# Altium PCB OmniCore_SDR.PcbDoc (part 5 of 13)
Units mil, origin at the board's own origin, x right, y up, seen from the top; angles counter-clockwise.
Board outline 4724.72 x 2755.91 mil, 8 copper layers (Top, GND 1, Layer 1, Layer 2, GND 2, Layer 3, Power, Bottom), stack 40.468 mil thick; 530 components, 427 nets, 2315 pads, 1715 vias.
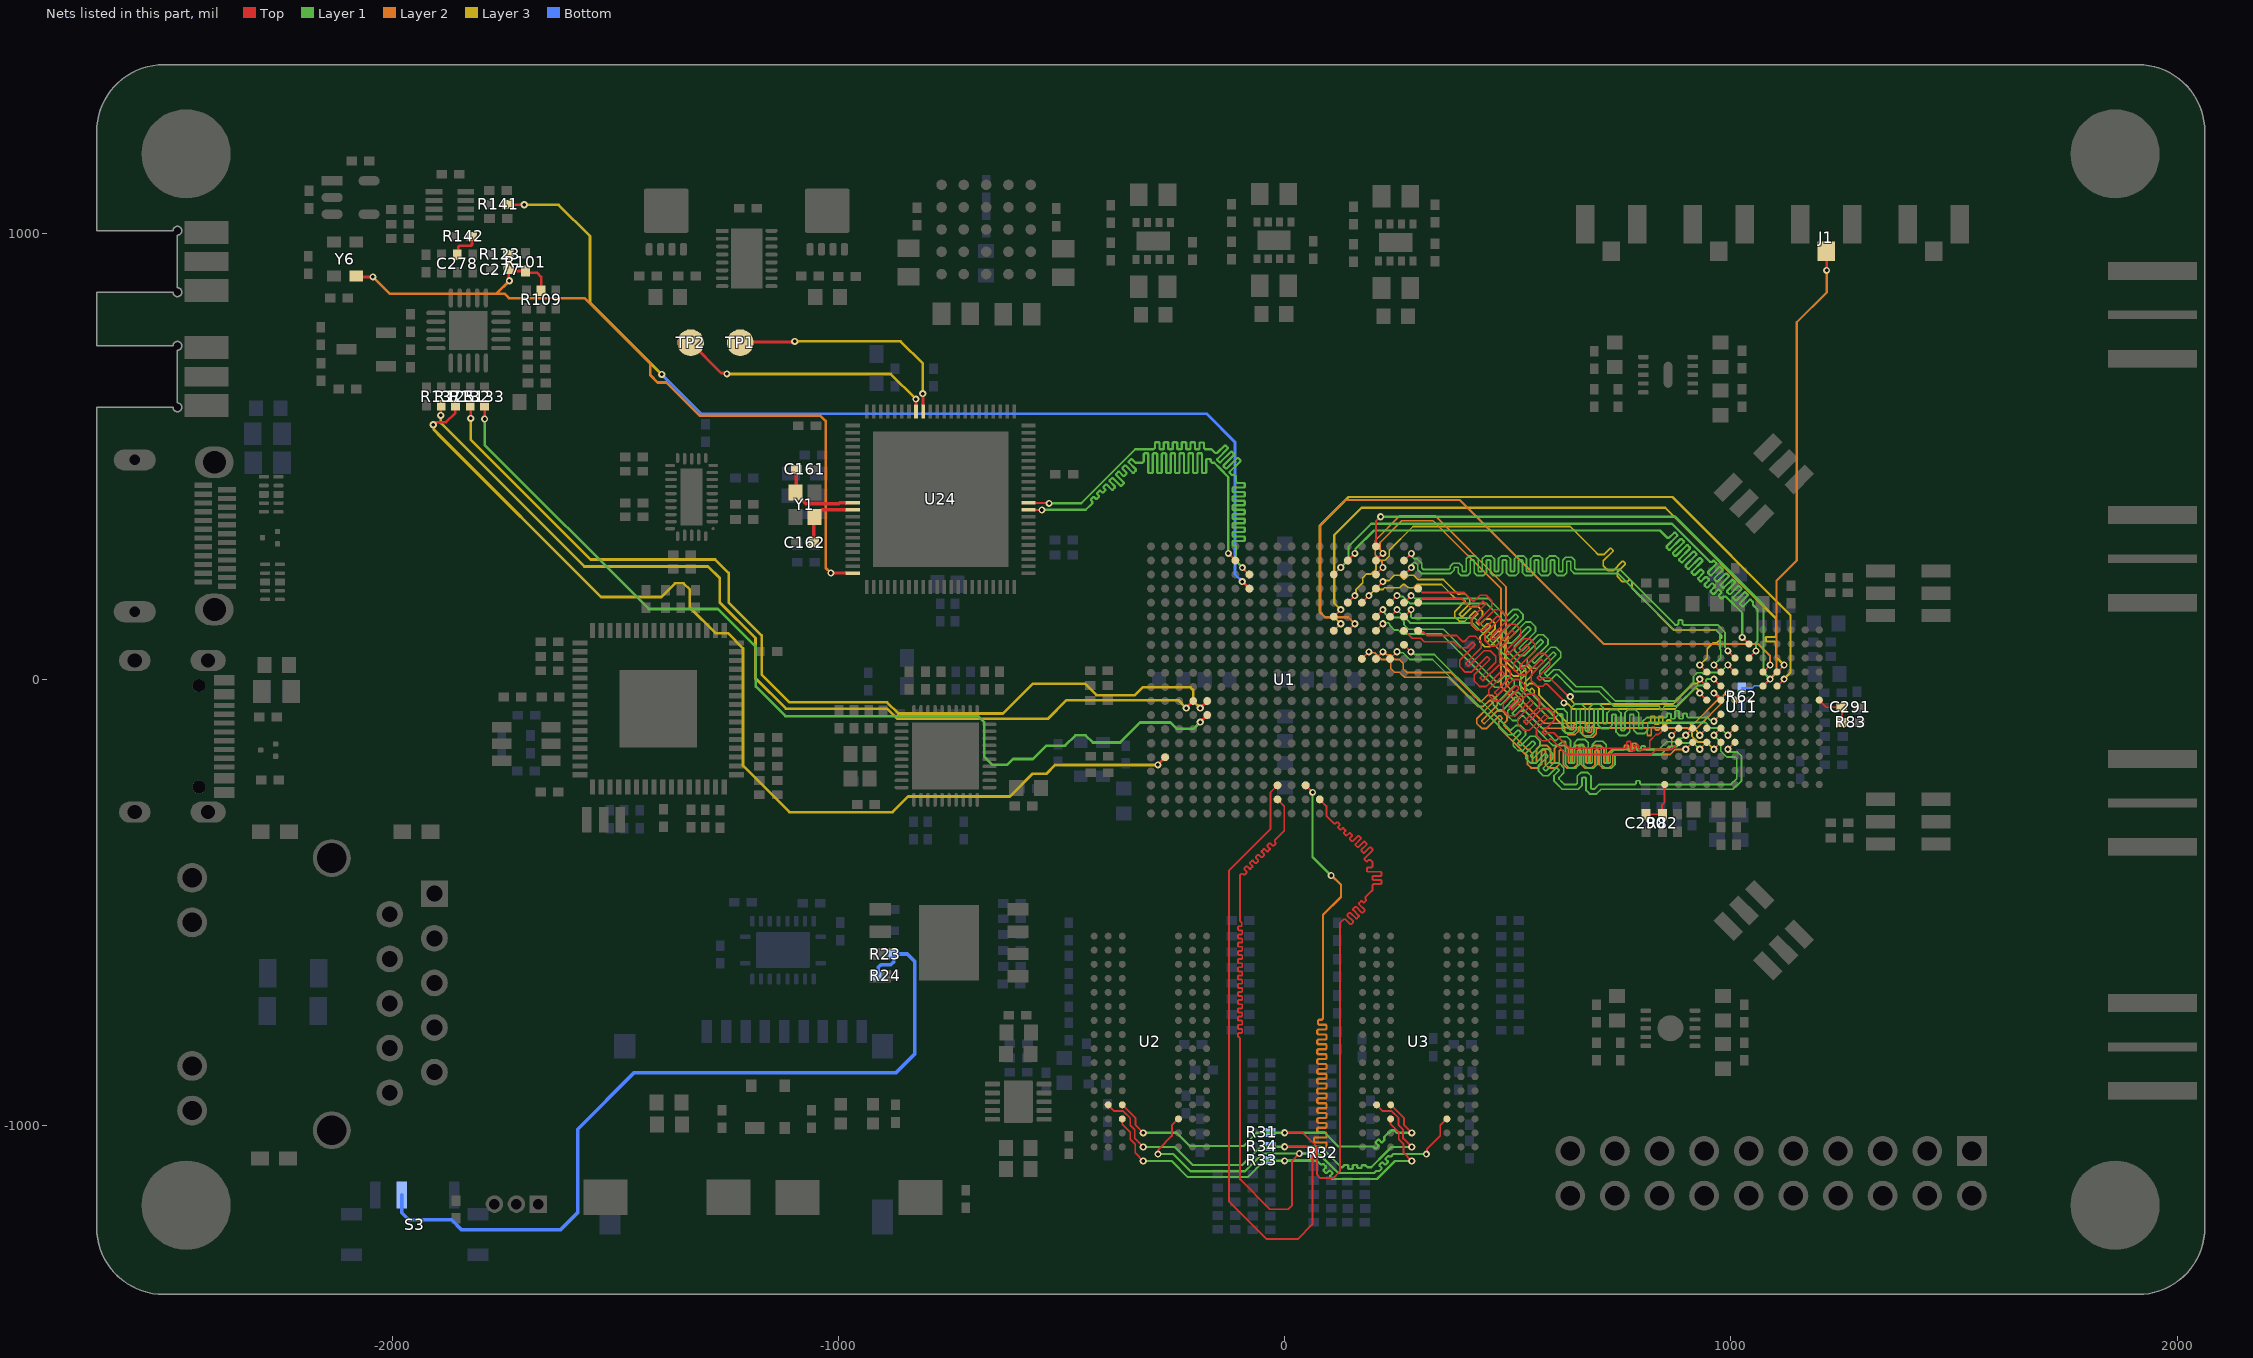
[diagram p10: the nets of this part, all layers, seen from the top]

## Via types
v1: diameter 16, hole 8, Top to Bottom, tented both sides, 1667 vias
v2: diameter 19.68, hole 7.87, Top to Bottom, 44 vias
v3: diameter 200, hole 125, Top to Bottom, 4 vias

## Nets (pads, with @x,y where several pads share a name; then routed paths per layer and width w, separated by ;. In a path a pad name is that pad's centre, name@x,y a point inside that pad or via, vN(x,y) a via of type N, cw(c..) or ccw(c..) an arc to the next point about the centre after c; other vN are vias at no path point) (continued)
AD9361_RX_D3_P: U1.R16 U11.J9 | length 1283.4
  Top w4: U1.R16@141.49,172.44 v1(157.28,188.23) ; v1(930.25,32.7) U11.J9@946,16.95
  Layer 3 w4: v1(157.28,188.23) 159.53,190.48 159.53,201.73 174.73,216.93 174.73,228.18 183.34,236.78 194.13,236.78 204.78,247.43 204.78,258.22 214.11,267.55 224.9,267.55 234.23,276.88 234.23,289.73 287.5,343 640,343 696,287 699.69,283.31 702.91,280.09 715.34,280.09 729.39,294.13 731.3,294.13 735.75,289.68 735.75,287.77 714.01,266.03 714.01,255.01 724.91,244.11 735.93,244.11 756.79,264.97 758.7,264.97 763.16,260.51 763.16,258.6 746.05,241.5 746.05,230.48 756.95,219.58 767.97,219.58 771.91,223.52 773.82,223.52 778.27,219.06 778.27,217.15 778.27,204.73 796,187 799.69,183.31 872.22,110.78 967.67,110.78 979,99.44 979,93.15 967.55,81.69 959.45,81.69 946.81,69.06 946.81,49.26 v1(930.25,32.7)
AD9361_RX_D4_N: U1.W19 U11.K7 | length 1328.2
  Top w4: U1.W19@267.47,266.93 267.95,266.93 283.52,282.5 v1(284,282.5) ; v1(993.24,64.2) U11.K7@1008.99,48.45
  Layer 1 w4: v1(284,282.5) 286.3,280.2 286.3,274.19 289.24,271.25 296.28,271.25 307,260.53 307,250.2 310.2,247 364,247 368.64,247 370.98,249.34 370.98,253.91 377.6,260.53 391.36,260.53 397.98,253.91 397.98,243.35 399.33,242 405.63,242 406.98,243.35 406.98,270.38 413.6,277 427.36,277 433.98,270.38 433.98,243.35 435.33,242 441.63,242 442.98,243.35 442.98,270.38 449.6,277 463.36,277 469.98,270.38 469.98,243.35 471.33,242 477.63,242 478.98,243.35 478.98,270.38 485.6,277 499.36,277 505.98,270.38 505.98,243.35 507.33,242 513.63,242 514.98,243.35 514.98,270.38 521.6,277 535.36,277 541.98,270.38 541.98,243.35 543.33,242 549.63,242 550.98,243.35 550.98,270.38 557.6,277 571.36,277 577.98,270.38 577.98,243.35 579.33,242 585.63,242 586.98,243.35 586.98,270.38 593.6,277 607.36,277 613.98,270.38 613.98,243.35 615.33,242 621.63,242 622.98,243.35 622.98,267.45 629.6,274.07 643.36,274.07 649.98,267.45 649.98,249.34 652.32,247 687,247 750.44,247 874.99,122.46 878.02,122.46 880.02,122.46 882.36,124.8 882.36,132.11 883.71,133.46 890.01,133.46 891.36,132.11 891.36,124.8 893.71,122.46 954,122.46 970.34,122.46 986.75,106.05 986.75,72.54 993.24,66.04 v1(993.24,64.2)
AD9361_RX_D4_P: U1.W18 U11.J8 | length 1329
  Top w4: U1.W18@267.47,235.43 267.95,235.43 283.52,251 v1(284,251) ; v1(961.75,32.7) U11.J8@977.5,16.95
  Layer 1 w4: v1(284,251) 286.3,253.3 286.3,259.31 289.24,262.25 292.55,262.25 298,256.8 298,246.47 306.47,238 364,238 372.36,238 379.98,245.62 379.98,250.18 381.33,251.53 387.63,251.53 388.98,250.18 388.98,239.62 395.6,233 409.36,233 415.98,239.62 415.98,266.65 417.33,268 423.63,268 424.98,266.65 424.98,239.62 431.6,233 445.36,233 451.98,239.62 451.98,266.65 453.33,268 459.63,268 460.98,266.65 460.98,239.62 467.6,233 481.36,233 487.98,239.62 487.98,266.65 489.33,268 495.63,268 496.98,266.65 496.98,239.62 503.6,233 517.36,233 523.98,239.62 523.98,266.65 525.33,268 531.63,268 532.98,266.65 532.98,239.62 539.6,233 553.36,233 559.98,239.62 559.98,266.65 561.33,268 567.63,268 568.98,266.65 568.98,239.62 575.6,233 589.36,233 595.98,239.62 595.98,266.65 597.33,268 603.63,268 604.98,266.65 604.98,239.62 611.6,233 625.36,233 631.98,239.62 631.98,263.72 633.33,265.07 639.63,265.07 640.98,263.72 640.98,245.62 648.59,238 687,238 746.72,238 871.26,113.46 871.47,113.46 873.47,111.46 878.02,111.46 965.78,111.46 975.75,101.49 975.75,67.98 977.31,66.42 977.31,48.27 v1(961.75,32.7)
AD9361_RX_D5_N: U1.W16 U11.J7 | length 1326.5
  Top w4: U1.W16@267.47,172.44 v1(283.22,188.19) ; v1(993.24,32.7) U11.J7@1008.99,16.95
  Layer 1 w4: v1(283.22,188.19) 285.07,188.19 291.56,181.69 456.06,181.69 490.88,146.88 494.57,143.19 497.89,143.19 511.93,157.23 522.95,157.23 533.85,146.33 533.85,135.31 497.89,99.35 497.89,97.44 502.34,92.99 504.25,92.99 540.21,128.95 551.24,128.95 562.13,118.05 562.13,107.03 526.17,71.07 526.17,69.16 530.63,64.7 532.54,64.7 568.5,100.66 579.52,100.66 590.42,89.77 590.42,78.74 554.46,42.78 554.46,40.87 558.91,36.42 560.82,36.42 596.78,72.38 607.8,72.38 618.7,61.48 618.7,50.46 582.74,14.5 582.74,12.59 587.2,8.13 589.11,8.13 603.15,22.18 615.58,22.18 632.1,5.65 635.8,1.96 653.76,-16 709,-16 741,-48 874.44,-48 916.25,-6.19 916.25,7 924.45,15.2 936.05,15.2 938.85,12.41 951.41,12.41 955.14,16.14 976.69,16.14 v1(993.24,32.7)
AD9361_RX_D5_P: U1.V16 U11.H8 | length 1326.2
  Top w4: U1.V16@235.98,172.44 v1(251.72,188.19) ; v1(961.75,1.2) U11.H8@977.5,-14.54
  Layer 1 w4: v1(251.72,188.19) 254.02,185.89 265.27,185.89 280.47,170.69 451.51,170.69 483.1,139.1 486.79,135.41 490.02,132.19 502.44,132.19 516.49,146.23 518.4,146.23 522.85,141.78 522.85,139.87 486.89,103.91 486.89,92.89 497.79,81.99 508.81,81.99 544.77,117.95 546.68,117.95 551.13,113.49 551.13,111.58 515.17,75.62 515.17,64.6 526.07,53.7 537.09,53.7 573.05,89.66 574.96,89.66 579.42,85.21 579.42,83.3 543.46,47.34 543.46,36.32 554.36,25.42 565.38,25.42 601.34,61.38 603.25,61.38 607.7,56.93 607.7,55.02 571.74,19.05 571.74,8.03 582.64,-2.87 593.66,-2.87 607.71,11.18 611.02,11.18 624.33,-2.12 628.02,-5.82 649.2,-27 704.44,-27 736.44,-59 827,-59 838,-59 840.34,-61.34 840.34,-65.72 841.69,-67.07 847.99,-67.07 849.34,-65.72 849.34,-61.34 851.69,-59 866,-59 879,-59 924.55,-13.45 935.4,-13.45 944.25,-4.59 944.25,-1.06 946.72,1.41 960.15,1.41 v1@961.05,0.51
AD9361_RX_FRAME_N: U1.U19 U11.G7 | length 1320.6
  Top w4: U1.U19@204.48,266.93 v1(220.23,282.68) ; v1(993.24,-30.29) U11.G7@1008.99,-46.04
  Layer 2 w4: v1(220.23,282.68) 220.23,284.52 213.73,291.02 213.73,307.18 262.56,356 332.44,356 485,203.44 485,-16.43 577.56,-109 585.17,-109 625.09,-109 627.43,-111.34 627.43,-115.37 635.23,-123.16 650.64,-123.16 658.43,-115.37 658.43,-107.35 659.78,-106 666.08,-106 667.43,-107.35 667.43,-121.21 675.23,-129 690.64,-129 698.43,-121.21 698.43,-111.34 700.78,-109 706,-109 799,-109 810,-109 812.34,-111.34 812.34,-124.19 813.69,-125.54 819.99,-125.54 821.34,-124.19 821.34,-108.83 822.69,-107.48 828.99,-107.48 830.34,-108.83 830.34,-111.34 831.69,-112.69 837.99,-112.69 839.34,-111.34 841.69,-109 862,-109 923.06,-109 983,-49.06 983,-44.45 983.05,-44.4 983.05,-39.9 983,-39.84 983,-36.53 985.34,-34.19 986.1,-34.19 990,-30.29 v1(993.24,-30.29)
AD9361_RX_FRAME_P: U1.U18 U11.G8 | length 1320.6
  Top w4: U1.U18@204.48,235.43 v1(220.23,251.18) ; v1(961.75,-30.29) U11.G8@977.5,-46.04
  Layer 2 w4: v1(220.23,251.18) 217.93,253.48 217.93,264.72 202.73,279.92 202.73,311.73 258,367 337,367 496,208 496,-11.88 582.12,-98 585.17,-98 629.65,-98 638.43,-106.79 638.43,-110.81 639.78,-112.16 646.08,-112.16 647.43,-110.81 647.43,-102.79 655.23,-95 670.64,-95 678.43,-102.79 678.43,-116.65 679.78,-118 686.08,-118 687.43,-116.65 687.43,-106.79 696.22,-98 706,-98 918.5,-98 972,-44.51 972,-36.53 969.65,-34.19 968.89,-34.19 965,-30.29 v1(961.75,-30.29)
AD9361_RXLO_EXT: C291.2 R83.1 U11.G1 | length 91.4
  Top w4.2: U11.G1@1197.97,-46.04 1213.93,-62 C291.2@1248.31,-62 1249.31,-63 R83.1@1249.31,-96
AD9361_SPI_CLK: U1.R14 U11.J5 | length 1524.6
  Top w4.2: U1.R14@141.49,109.45 v1(157.24,125.2) ; U11.J5@1071.98,16.95 v1(1087.73,32.7)
  Layer 2 w5: v1(157.24,125.2) 142.74,139.7 90.3,139.7 83,147 83,147.43 79.74,150.69 79.74,345.74 129,395 136.5,402.5 392.5,402.5 715.04,79.96 1060.98,79.96 1087.73,53.21 v1(1087.73,32.7)
AD9361_SPI_DI: U1.P15 U11.J4 | length 1488.1
  Top w4.2: U1.P15@109.99,140.94 v1(125.74,156.69) ; U11.J4@1103.48,16.95 v1(1119.23,32.7)
  Layer 3 w5: v1(125.74,156.69) 111.24,171.19 111.24,324.24 172,385 853,385 1101,137 1101,111 1101,98.5 1098.07,95.57 1079.66,95.57 1078.16,94.07 1078.16,87.07 1079.66,85.57 1098.07,85.57 1101,82.64 1101,62 1101,50.93 v1(1119.23,32.7)
AD9361_SPI_DO: U1.R19 U11.L6 | length 1533.5
  Top w4.2: U1.R19@141.49,266.93 v1(157.24,282.68) ; v1(1025.5,94.46) 1025.74,94.46 1040.25,79.94 U11.L6@1040.49,79.94
  Layer 1 w5: v1(157.24,282.68) 158.92,284.36 158.92,292.92 200,334 841,334 855.5,319.5 857.27,317.73 861.41,317.73 872.91,329.24 875.04,329.24 879.99,324.29 879.99,322.17 855.83,298.01 855.83,295.89 860.78,290.94 862.91,290.94 887.06,315.09 889.18,315.09 894.13,310.14 894.13,308.02 869.98,283.87 869.98,281.75 874.93,276.8 877.05,276.8 901.2,300.95 903.32,300.95 908.27,296 908.27,293.88 884.12,269.73 884.12,267.61 889.07,262.66 891.19,262.66 915.34,286.81 917.46,286.81 922.41,281.86 922.41,279.74 898.26,255.59 898.26,253.47 903.21,248.52 905.33,248.52 929.48,272.67 931.6,272.67 936.55,267.72 936.55,265.6 912.4,241.45 912.4,239.32 917.35,234.37 919.47,234.37 931.7,246.6 933.82,246.6 938.77,241.65 938.77,239.53 926.55,227.3 926.55,225.18 931.5,220.23 933.62,220.23 943.13,229.75 945.25,229.75 950.2,224.8 950.2,222.68 940.69,213.16 940.69,211.04 945.64,206.09 947.76,206.09 957.27,215.61 959.39,215.61 964.34,210.66 964.34,208.53 954.83,199.02 954.83,196.9 959.78,191.95 961.9,191.95 971.42,201.46 973.54,201.46 978.49,196.51 978.49,194.39 973.07,188.98 973.07,186.86 978.02,181.91 980.14,181.91 984.55,186.31 988.69,186.31 1006.93,168.07 1008.7,166.3 1025.5,149.5 v1(1025.5,94.46)
AD9361_SPI_ENB: U1.P18 U11.K6 | length 1533.9
  Top w4.2: U1.P18@109.99,235.43 v1(125.74,251.18) ; U11.K6@1040.49,48.45 v1(1056.24,64.2)
  Layer 1 w5: v1(125.74,251.18) 142.74,268.18 142.74,297.74 194,349 868,349 951.5,265.5 953.27,263.73 957.41,263.73 959.91,266.24 962.04,266.24 966.99,261.29 966.99,259.17 948.83,241.01 948.83,238.89 953.78,233.94 955.91,233.94 974.06,252.09 976.18,252.09 981.13,247.14 981.13,245.02 962.98,226.87 962.98,224.75 967.93,219.8 970.05,219.8 988.2,237.95 990.32,237.95 995.27,233 995.27,230.88 977.12,212.73 977.12,210.61 982.07,205.66 984.19,205.66 1002.34,223.81 1004.46,223.81 1009.41,218.86 1009.41,216.74 991.26,198.59 991.26,196.47 996.21,191.52 998.33,191.52 1016.48,209.67 1018.6,209.67 1023.55,204.72 1023.55,202.6 1005.4,184.45 1005.4,182.32 1010.35,177.37 1012.47,177.37 1030.63,195.53 1032.75,195.53 1037.7,190.58 1037.7,188.45 1020.48,171.23 1020.48,169.11 1025.43,164.16 1027.55,164.16 1042.26,178.88 1044.39,178.88 1049.33,173.93 1049.33,171.81 1049.33,167.67 1050.23,166.77 1052,165 1059.3,157.7 1059.3,85.3 1056.24,82.24 v1(1056.24,64.2)
AD9361_SYNC: J1.1 R62.1 U1.U20 U11.H5 | length 2288.6
  Top w4.2: U1.U20@204.48,298.43 204.48,354.48 v1(215,365) ; U11.H5@1071.98,-14.54 v1(1087.73,1.2)
  Top w5: J1.1@1213.81,959.68 1214.6,958.89 v1(1214.6,917)
  Layer 1 w5: v1(215,365) 876,365 1073.23,167.77 1073.23,15.7 v1(1087.73,1.2)
  Layer 2 w5: v1(1087.73,1.2) 1102.23,15.7 1102.23,221.7 1147.65,267.12 1147.65,800.75 1214.6,867.7 v1(1214.6,917)
  Bottom w4.2: R62.1@1024.5,-18.86 1047.73,-18.86 1052.89,-13.7 1072.4,-13.7 1087.3,1.2 v1(1087.73,1.2)
AD9361_TX_D0_N: U1.Y14 U11.E12 | length 1345.6
  Top w4: U1.Y14@298.97,109.45 301.59,106.82 308.16,106.82 310.92,106.81 318.73,99 385,99 394.5,89.5 398.81,85.19 402.13,85.19 414.22,97.28 427.73,97.28 440.39,84.62 440.39,71.12 406.38,37.11 406.38,35.2 410.83,30.74 412.74,30.74 446.75,64.75 460.26,64.75 472.91,52.1 472.91,38.59 438.9,4.58 438.9,2.67 443.36,-1.78 445.27,-1.78 479.28,32.23 492.78,32.23 505.44,19.57 505.44,6.06 471.43,-27.95 471.43,-29.85 475.88,-34.31 477.79,-34.31 512.32,0.21 525.82,0.21 538.48,-12.44 538.48,-25.95 503.96,-60.47 503.96,-62.38 508.41,-66.84 510.32,-66.84 545.04,-32.12 558.54,-32.12 571.2,-44.77 571.2,-58.28 536.48,-93 536.48,-94.91 540.94,-99.36 542.85,-99.36 577.56,-64.64 591.07,-64.64 603.73,-77.3 603.73,-90.81 578.06,-116.47 578.06,-118.38 582.52,-122.84 584.43,-122.84 588.18,-119.09 603.09,-119.09 636.36,-152.36 637.71,-153.71 762,-153.71 764,-153.71 766.34,-151.37 766.34,-140.06 767.69,-138.71 773.99,-138.71 775.34,-140.06 775.34,-158.36 776.69,-159.71 782.99,-159.71 784.34,-158.36 784.34,-148.41 785.69,-147.06 791.99,-147.06 793.34,-148.41 793.34,-156.05 794.69,-157.4 800.99,-157.4 802.34,-156.05 804.69,-153.71 810,-153.71 815.66,-153.71 818,-151.37 818,-137.2 832.2,-123 834.1,-123 837.35,-123 841.48,-118.87 841.67,-118.87 U11.E12@851.51,-109.03
AD9361_TX_D0_P: U1.W14 U11.D11 | length 1345.3
  Top w4: U1.W14@267.47,109.45 268.89,109.45 285.53,92.81 305.12,92.81 312.93,85 379.2,85 384.6,79.6 393.02,71.19 407.93,71.19 420.02,83.28 421.93,83.28 426.39,78.83 426.39,76.92 392.38,42.91 392.38,29.4 405.03,16.74 418.54,16.74 452.55,50.75 454.46,50.75 458.91,46.3 458.91,44.39 424.9,10.38 424.9,-3.13 435.07,-13.3 437.56,-15.78 451.06,-15.78 485.07,18.23 486.98,18.23 491.44,13.77 491.44,11.86 457.43,-22.15 457.43,-35.65 470.08,-48.31 483.59,-48.31 518.12,-13.79 520.02,-13.79 524.48,-18.24 524.48,-20.15 489.96,-54.67 489.96,-68.18 502.61,-80.84 516.12,-80.84 550.84,-46.12 552.75,-46.12 557.2,-50.57 557.2,-52.48 522.48,-87.2 522.48,-100.71 535.14,-113.36 548.65,-113.36 583.36,-78.64 585.27,-78.64 589.73,-83.1 589.73,-85.01 564.06,-110.67 564.06,-124.18 576.72,-136.84 590.23,-136.84 593.97,-133.09 597.29,-133.09 626.46,-162.26 631.91,-167.71 762,-167.71 821.46,-167.71 832.16,-157 866.54,-157 867.26,-156.28 U11.D11@883.01,-140.53
AD9361_TX_D1_N: U1.U12 U11.E11 | length 1319.8
  Top w4: U1.U12@204.48,46.46 v1(220.23,62.2) ; v1(867.13,-125.13) 867.13,-125.02 883.01,-109.14 U11.E11@883.01,-109.03
  Layer 2 w4: v1(220.23,62.2) 222.08,62.2 228.57,55.71 236.17,55.71 247.17,44.71 257.52,44.71 265.72,36.51 265.72,23.76 273.49,16 372,16 433.5,-45.5 437.19,-49.19 440.51,-49.19 454.55,-35.15 465.57,-35.15 476.47,-46.05 476.47,-57.07 441.51,-92.03 441.51,-93.94 445.97,-98.39 447.88,-98.39 476.17,-70.09 487.2,-70.09 498.09,-80.99 498.09,-92.01 490.71,-99.4 490.71,-102.71 496.24,-108.24 499.93,-111.93 520,-132 545,-157 546.65,-157 555.43,-165.79 555.43,-185.65 556.78,-187 563.08,-187 564.43,-185.65 564.43,-155.29 572.23,-147.5 587.64,-147.5 595.43,-155.29 595.43,-185.65 596.78,-187 603.08,-187 604.43,-185.65 604.43,-155.29 612.23,-147.5 627.64,-147.5 635.43,-155.29 635.43,-185.65 636.78,-187 643.08,-187 644.43,-185.65 644.43,-155.29 652.23,-147.5 667.64,-147.5 675.43,-155.29 675.43,-185.65 676.78,-187 683.08,-187 684.43,-185.65 684.43,-155.29 692.23,-147.5 707.64,-147.5 715.43,-155.29 715.43,-185.65 716.78,-187 723.08,-187 724.43,-185.65 724.43,-165.79 733.22,-157 743,-157 756.86,-157 758.86,-157 761.21,-154.66 761.21,-148.94 762.56,-147.59 768.86,-147.59 770.21,-148.94 770.21,-158.65 771.56,-160 777.86,-160 779.21,-158.65 779.21,-144.22 780.56,-142.87 786.86,-142.87 788.21,-144.22 788.21,-154.66 790.55,-157 823,-157 858.87,-157 867.25,-148.62 867.25,-125.24 v1(867.13,-125.13)
AD9361_TX_D1_P: U1.T12 U11.D10 | length 1319.8
  Top w4: U1.T12@172.98,46.46 v1(188.73,62.2) ; v1(898.76,-156.28) U11.D10@914.5,-140.53
  Layer 2 w4: v1(188.73,62.2) 191.03,59.91 202.28,59.91 217.48,44.71 231.61,44.71 237.72,38.6 237.72,24.91 246.08,16.56 257.37,16.56 268.93,5 367.44,5 425.72,-53.28 429.41,-56.97 432.64,-60.19 445.06,-60.19 459.11,-46.15 461.02,-46.15 465.47,-50.6 465.47,-52.51 430.51,-87.47 430.51,-98.49 441.41,-109.39 452.43,-109.39 480.73,-81.09 482.64,-81.09 487.09,-85.55 487.09,-87.46 479.71,-94.84 479.71,-107.27 488.46,-116.01 492.15,-119.71 520,-147.56 540.44,-168 542.09,-168 544.43,-170.34 544.43,-190.21 552.23,-198 567.64,-198 575.43,-190.21 575.43,-159.85 576.78,-158.5 583.08,-158.5 584.43,-159.85 584.43,-190.21 592.23,-198 607.64,-198 615.43,-190.21 615.43,-159.85 616.78,-158.5 623.08,-158.5 624.43,-159.85 624.43,-190.21 632.23,-198 647.64,-198 655.43,-190.21 655.43,-159.85 656.78,-158.5 663.08,-158.5 664.43,-159.85 664.43,-190.21 672.23,-198 687.64,-198 695.43,-190.21 695.43,-159.85 696.78,-158.5 703.08,-158.5 704.43,-159.85 704.43,-190.21 712.23,-198 727.64,-198 735.43,-190.21 735.43,-170.34 737.78,-168 743,-168 756.86,-168 863.42,-168 875.03,-156.39 898.64,-156.39 v1(898.76,-156.28)
AD9361_TX_D2_N: U1.U15 U11.E10 | length 1328.9
  Top w4: U1.U15@204.48,140.94 v1(220.23,156.69) ; v1(898.76,-124.78) U11.E10@914.5,-109.03
  Layer 1 w4: v1(220.23,156.69) 220.23,153.45 224.34,149.33 224.34,149.01 238.39,134.97 241.7,134.97 245.93,139.2 257.52,139.2 267.38,129.34 267.38,122.86 277.24,113 356,113 441,28 471.5,-2.5 475.19,-6.19 478.51,-6.19 492.55,7.85 503.57,7.85 510.31,1.11 514.47,-3.05 514.47,-14.07 478.51,-50.03 478.51,-51.94 482.97,-56.39 484.87,-56.39 512.47,-28.8 523.49,-28.8 534.39,-39.7 534.39,-50.72 510.7,-74.41 510.7,-76.31 515.16,-80.77 517.07,-80.77 527.2,-70.63 539.63,-70.63 574.31,-105.31 578,-109 594,-125 605.42,-136.42 608.73,-136.42 617.23,-127.92 632.64,-127.92 640.43,-135.72 640.43,-185.65 641.78,-187 648.08,-187 649.43,-185.65 649.43,-141.79 657.23,-134 672.64,-134 680.43,-141.79 680.43,-185.65 681.78,-187 688.08,-187 689.43,-185.65 689.43,-145.79 697.23,-138 712.64,-138 720.43,-145.79 720.43,-185.65 721.78,-187 728.08,-187 729.43,-185.65 729.43,-165.79 738.22,-157 748,-157 754,-157 778.31,-157 780.66,-154.66 782.01,-153.31 788.31,-153.31 789.66,-154.66 789.66,-157.92 791.01,-159.27 797.31,-159.27 798.66,-157.92 798.66,-150.35 800.01,-149 806.31,-149 807.66,-150.35 807.66,-154.66 810,-157 821,-157 837.8,-157 855.67,-139.13 873.87,-139.13 881.72,-131.28 890.41,-131.28 896.91,-124.78 v1(898.76,-124.78)
AD9361_TX_D2_P: U1.U14 U11.D9 | length 1328.2
  Top w4: U1.U14@204.48,109.45 v1(220.23,125.2) ; v1(930.25,-156.28) U11.D9@946,-140.53
  Layer 1 w4: v1(220.23,125.2) 222.39,127.36 231.89,127.36 235.27,123.97 235.27,121.85 245.93,111.2 254.6,111.2 263.8,102 351.44,102 429.33,24.11 463.72,-10.28 467.41,-13.97 470.64,-17.19 483.06,-17.19 497.11,-3.15 499.02,-3.15 503.47,-7.6 503.47,-9.51 467.51,-45.47 467.51,-56.49 478.41,-67.39 489.43,-67.39 517.02,-39.8 518.93,-39.8 523.39,-44.26 523.39,-46.16 499.7,-69.85 499.7,-80.87 510.6,-91.77 521.62,-91.77 531.76,-81.63 535.07,-81.63 566.53,-113.09 570.22,-116.78 573.44,-120 591,-137.56 600.86,-147.42 613.29,-147.42 621.78,-138.92 628.08,-138.92 629.43,-140.27 629.43,-190.21 637.23,-198 652.64,-198 660.43,-190.21 660.43,-146.35 661.78,-145 668.08,-145 669.43,-146.35 669.43,-190.21 677.23,-198 692.64,-198 700.43,-190.21 700.43,-150.35 701.78,-149 708.08,-149 709.43,-150.35 709.43,-190.21 717.23,-198 732.64,-198 740.43,-190.21 740.43,-170.34 742.78,-168 748,-168 842.36,-168 860.23,-150.13 878.42,-150.13 886.27,-142.28 916.25,-142.28 v1(930.25,-156.28)
AD9361_TX_D3_N: U1.U17 U11.E9 | length 1283.4
  Top w4: U1.U17@204.48,203.94 v1(220.23,219.68) ; v1(930.25,-124.78) U11.E9@946,-109.03
  Layer 3 w4: v1(220.23,219.68) 222.52,221.98 234.22,221.98 245.93,233.68 257.52,233.68 265.82,225.39 269.13,225.39 277.42,233.68 289.02,233.68 298.7,224 355.95,224 384.97,194.97 388.66,191.28 391.98,191.28 392.98,192.28 404,192.28 414.9,181.38 414.9,170.36 391.98,147.44 391.98,145.53 396.44,141.08 398.35,141.08 421.26,163.99 432.28,163.99 443.18,153.1 443.18,142.07 430.19,129.08 430.19,127.17 434.64,122.71 436.55,122.71 449.55,135.71 460.57,135.71 471.47,124.81 471.47,113.79 448.55,90.88 448.55,88.97 453.01,84.51 454.92,84.51 478.25,107.85 489.27,107.85 500.17,96.95 500.17,85.93 493.89,79.65 493.89,71.03 493.89,63.64 493.89,42.03 512.96,22.96 516.65,19.27 519.96,19.27 531.78,31.08 542.8,31.08 553.7,20.18 553.7,9.16 537.95,-6.59 537.95,-8.5 542.4,-12.95 544.31,-12.95 548.25,-9.02 559.27,-9.02 570.17,-19.92 570.17,-30.94 570.17,-34.25 570.27,-34.35 573.96,-38.04 632.92,-97 816,-97 818,-97 820.34,-94.66 820.34,-83.35 821.69,-82 827.99,-82 829.34,-83.35 829.34,-98.65 830.69,-100 836.99,-100 838.34,-98.65 838.34,-83.35 839.69,-82 845.99,-82 847.34,-83.35 847.34,-98.65 848.69,-100 854.99,-100 856.34,-98.65 856.34,-92.23 857.69,-90.88 863.99,-90.88 865.34,-92.23 865.34,-94.66 867.69,-97 876,-97 906.33,-97 923.76,-114.42 923.76,-116.44 930.25,-122.93 v1(930.25,-124.78)
AD9361_TX_D3_P: U1.T16 U11.D8 | length 1283.4
  Top w4: U1.T16@172.98,172.44 v1(188.73,188.19) ; v1(961.75,-156.28) U11.D8@977.5,-140.53
  Layer 3 w4: v1(188.73,188.19) 202.73,202.19 220.19,202.19 223.68,205.68 257.52,205.68 264.79,212.95 269.27,212.95 276.54,205.68 289.02,205.68 296.33,213 351.39,213 377.19,187.19 380.89,183.5 384.11,180.28 396.54,180.28 397.53,181.28 399.44,181.28 403.9,176.82 403.9,174.91 380.98,152 380.98,140.98 391.88,130.08 402.9,130.08 425.82,152.99 427.73,152.99 432.18,148.54 432.18,146.63 419.19,133.63 419.19,122.61 430.08,111.71 441.11,111.71 454.1,124.71 456.01,124.71 460.47,120.26 460.47,118.35 437.55,95.43 437.55,84.41 448.45,73.51 459.47,73.51 482.81,96.85 484.72,96.85 489.17,92.39 489.17,90.48 482.89,84.2 482.89,71.03 482.89,52.64 482.89,37.47 505.18,15.18 508.87,11.49 512.09,8.27 524.52,8.27 536.34,20.08 538.25,20.08 542.7,15.63 542.7,13.72 526.95,-2.03 526.95,-13.06 537.85,-23.95 548.87,-23.95 552.81,-20.02 554.71,-20.02 559.17,-24.47 559.17,-26.38 559.17,-38.81 562.49,-42.13 566.18,-45.82 628.36,-108 901.78,-108 912.76,-118.98 912.76,-127.08 925.39,-139.72 945.19,-139.72 v1(961.75,-156.28)
AD9361_TX_D4_N: U1.W13 U11.E8 | length 1328.3
  Top w4: U1.W13@267.47,77.95 267.47,77.67 282.94,62.19 v1(282.94,61.91) ; v1(961.75,-124.78) U11.E8@977.5,-109.03
  Layer 1 w4: v1(282.94,61.91) 285.38,61.91 291.29,56 335.81,56 435.97,-44.15 439.86,-48.04 500.91,-109.09 504.6,-112.79 507.91,-112.79 517.8,-102.89 528.83,-102.89 539.72,-113.79 539.72,-124.81 523.01,-141.53 523.01,-143.44 527.47,-147.89 529.38,-147.89 550.24,-127.02 561.26,-127.02 572.16,-137.92 572.16,-148.94 551.3,-169.81 551.3,-171.72 555.75,-176.17 557.66,-176.17 578.53,-155.31 589.55,-155.31 600.45,-166.21 600.45,-177.23 579.58,-198.09 579.58,-200 584.04,-204.46 585.94,-204.46 603.65,-186.75 614.67,-186.75 625.57,-197.65 625.57,-208.67 614.68,-219.56 614.68,-222.87 622.21,-230.4 625.91,-234.09 626.81,-235 648,-235 653.22,-235 655.57,-232.66 655.57,-216.13 663.36,-208.34 678.77,-208.34 686.57,-216.13 686.57,-243.79 687.92,-245.14 694.22,-245.14 695.57,-243.79 704.35,-235 737,-235 783,-235 785,-235 787.34,-232.66 787.34,-228.29 788.69,-226.94 794.99,-226.94 796.34,-228.29 796.34,-232.66 798.69,-235 832,-235 1000,-235 1013,-222 1013,-176.56 1009.94,-173.5 990.67,-173.5 977.31,-160.14 977.31,-140.34 v1(961.75,-124.78)
AD9361_TX_D4_P: U1.V12 U11.D7 | length 1320
  Top w4: U1.V12@235.98,46.46 v1(251.76,62.24) ; v1(993.24,-156.28) U11.D7@1008.99,-140.53
  Layer 1 w4: v1@251.88,62.24 v1(251.76,62.24) 254.06,59.94 265.11,59.94 280.05,45 331.26,45 493.13,-116.87 496.82,-120.56 500.04,-123.79 512.47,-123.79 522.36,-113.89 524.27,-113.89 528.72,-118.35 528.72,-120.26 512.01,-136.97 512.01,-147.99 522.91,-158.89 533.93,-158.89 554.8,-138.02 556.71,-138.02 561.16,-142.48 561.16,-144.39 540.3,-165.25 540.3,-176.28 551.2,-187.17 562.22,-187.17 583.08,-166.31 584.99,-166.31 589.45,-170.76 589.45,-172.67 568.58,-193.54 568.58,-204.56 579.48,-215.46 590.5,-215.46 608.2,-197.75 610.11,-197.75 614.57,-202.21 614.57,-204.12 603.68,-215 603.68,-227.43 614.44,-238.18 618.13,-241.87 622.26,-246 648,-246 657.78,-246 666.57,-237.21 666.57,-220.69 667.92,-219.34 674.22,-219.34 675.57,-220.69 675.57,-248.34 683.36,-256.14 698.77,-256.14 706.57,-248.34 708.91,-246 737,-246 1004.56,-246 1024,-226.56 1024,-172 1014.5,-162.5 998.78,-162.5
AD9361_TX_D5_N: U1.W15 U11.F8 | length 1328.8
  Top w4: U1.W15@267.47,140.94 v1(283.22,156.69) ; v1(961.75,-93.28) U11.F8@977.5,-77.54
  Layer 1 w4: v1(283.22,156.69) 283.22,140.34 285.56,138 425.56,138 540,23.56 540,-18.44 574.56,-53 584.78,-63.22 597.31,-75.75 600.62,-75.75 610.23,-66.14 625.64,-66.14 633.43,-73.94 633.43,-107.57 634.78,-108.92 641.08,-108.92 642.43,-107.57 642.43,-62.79 650.23,-55 665.64,-55 673.43,-62.79 673.43,-113.65 674.78,-115 681.08,-115 682.43,-113.65 682.43,-62.79 690.23,-55 705.64,-55 713.43,-62.79 713.43,-97.65 714.78,-99 721.08,-99 722.43,-97.65 722.43,-74.79 730.23,-67 745.64,-67 753.43,-74.79 753.43,-112.65 754.78,-114 761.08,-114 762.43,-112.65 762.43,-74.79 770.23,-67 785.64,-67 793.43,-74.79 793.43,-108.65 794.78,-110 801.08,-110 802.43,-108.65 802.43,-93.79 811.22,-85 821,-85 841,-85 854.31,-85 856.66,-82.66 856.66,-77.36 858.01,-76.01 864.31,-76.01 865.66,-77.36 865.66,-86.65 867.01,-88 873.31,-88 874.66,-86.65 874.66,-71.35 876.01,-70 882.31,-70 883.66,-71.35 883.66,-86.65 885.01,-88 891.31,-88 892.66,-86.65 892.66,-77.35 894.01,-76 900.31,-76 901.66,-77.35 901.66,-82.66 904,-85 915,-85 947.56,-85 950.78,-88.22 953.54,-90.99 959.45,-90.99 v1(961.75,-93.28)
AD9361_TX_D5_P: U1.V15 U11.E7 | length 1328.2
  Top w4: U1.V15@235.98,140.94 v1(251.72,156.69) ; v1(993.24,-124.78) U11.E7@1008.99,-109.03
  Layer 1 w4: v1(251.72,156.69) 251.72,156.31 281.03,127 421,127 529,19 529,-23 567,-61 580.22,-74.22 592.75,-86.75 605.18,-86.75 614.78,-77.14 621.08,-77.14 622.43,-78.49 622.43,-112.13 630.23,-119.92 645.64,-119.92 653.43,-112.13 653.43,-67.35 654.78,-66 661.08,-66 662.43,-67.35 662.43,-118.21 670.23,-126 685.64,-126 693.43,-118.21 693.43,-67.35 694.78,-66 701.08,-66 702.43,-67.35 702.43,-102.21 710.23,-110 725.64,-110 733.43,-102.21 733.43,-79.35 734.78,-78 741.08,-78 742.43,-79.35 742.43,-117.21 750.23,-125 765.64,-125 773.43,-117.21 773.43,-79.35 774.78,-78 781.08,-78 782.43,-79.35 782.43,-113.21 790.23,-121 805.64,-121 813.43,-113.21 813.43,-98.34 815.78,-96 821,-96 943,-96 955.43,-108.43 976.89,-108.43 v1(993.24,-124.78)
AD9361_TX_FRAME_N: U1.Y17 U11.H9 | length 1285.7
  Top w4: U1.Y17@298.97,203.94 299.17,203.94 307.92,195.19 402.57,195.19 417.38,180.38 421.69,176.06 425.01,176.06 437.81,188.87 451.32,188.87 463.97,176.21 463.97,162.7 432.39,131.12 432.39,129.21 436.84,124.76 438.75,124.76 470.34,156.34 483.84,156.34 496.5,143.68 496.5,130.18 462.17,95.85 462.17,93.94 466.63,89.49 468.54,89.49 502.86,123.81 516.37,123.81 529.03,111.16 529.03,97.65 494.7,63.32 494.7,61.41 499.15,56.96 501.06,56.96 535.39,91.29 548.9,91.29 561.55,78.63 561.55,65.12 527.22,30.8 527.22,28.89 531.68,24.43 533.59,24.43 567.92,58.76 581.42,58.76 594.08,46.1 594.08,32.6 566.76,5.28 566.76,3.37 571.21,-1.09 573.12,-1.09 578.53,4.32 593.44,4.32 613.88,-16.12 631.98,-34.22 632.97,-34.22 636.75,-38 v1(640,-38) ; v1(930.25,1.2) U11.H9@946,-14.54
  Layer 3 w4: v1(640,-38) 642.3,-40.3 642.3,-46.66 650.64,-55 870.19,-55 916.14,-9.04 924.01,-9.04 926.36,-6.7 926.36,-5.94 930.25,-2.04 v1(930.25,1.2)
AD9361_TX_FRAME_P: U1.Y16 U11.G9 | length 1283.2
  Top w4: U1.Y16@298.97,172.44 299.17,172.44 307.92,181.19 396.77,181.19 407.48,170.48 415.89,162.06 430.81,162.06 443.61,174.87 445.52,174.87 449.97,170.41 449.97,168.5 418.39,136.92 418.39,123.41 431.04,110.76 444.55,110.76 476.13,142.34 478.04,142.34 482.5,137.89 482.5,135.98 448.17,101.65 448.17,88.14 460.83,75.49 474.33,75.49 508.66,109.81 510.57,109.81 515.03,105.36 515.03,103.45 480.7,69.12 480.7,55.62 493.35,42.96 506.86,42.96 541.19,77.29 543.1,77.29 547.55,72.83 547.55,70.92 513.22,36.6 513.22,23.09 525.88,10.43 539.39,10.43 573.72,44.76 575.62,44.76 580.08,40.31 580.08,38.4 552.76,11.07 552.76,-2.43 562.93,-12.61 565.41,-15.09 578.92,-15.09 584.33,-9.68 587.64,-9.68 603.98,-26.02 622.08,-44.12 622.08,-45.12 625.86,-48.89 v1(625.86,-52.14) ; v1(930.25,-30.29) U11.G9@946,-46.04
  Layer 3 w4: v1(625.86,-52.14) 628.15,-54.44 634.52,-54.44 646.08,-66 874.74,-66 920.7,-20.04 924.01,-20.04 926.36,-22.39 926.36,-23.15 930.25,-27.04 v1(930.25,-30.29)
AD9361_TXLO_EXT: C290.2 R82.1 U11.A12 | length 106.4
  Top w4.2: C290.2@809.5,-301.86 R82.1@846.5,-301.86 845.9,-301.26 845.9,-280.4 851.51,-274.79 U11.A12@851.51,-235.02
AD9361_TXNRX: U1.P14 U11.H4 | length 1636.5
  Top w4.2: U1.P14@109.99,109.45 v1(125.74,125.2) ; U11.H4@1103.48,-14.54 v1(1119.23,1.2)
  Layer 3 w5: v1(125.74,125.2) 111.24,139.7 90.73,139.7 78,152.43 78,344 143,409 869,409 1133.73,144.27 1133.73,15.7 v1(1119.23,1.2)
ADF4001_CE: R137.1 U1.D9 | length 2116.6
  Top w6: v1(-1891.31,592) -1891.31,613.7 R137.1@-1890.35,614.66 ; v1(-220.72,-63.78) U1.D9@-204.97,-48.03
  Layer 3 w6: v1(-1891.31,592) -1891.04,591.74 -1891.04,575.04 -1569.6,253.6 -1292.39,253.6 -1265.98,227.2 -1265.98,172.98 -1186,93 -1186,3 -1118,-65 -891,-65 -868,-88 -531,-88 -489,-46 -238.5,-46 v1(-220.72,-63.78)
ADF4001_CLK: R125.1 U1.B5 | length 2337.9
  Top w4.2: v1(-284.22,-191.27) v1@-284.22,-190.77 ; U1.B5@-267.96,-174.51 U1.B5@-267.96,-174.02
  Top w6: v1(-1908,571) -1905.49,571 -1899.49,577 -1879,577 -1858.63,597.37 -1858.63,614.37 R125.1@-1858.35,614.66 ; v1@-284.22,-190.77 U1.B5@-267.96,-174.51
  Layer 3 w6: v1(-1908,571) -1906.98,569.98 -1906.98,559.98 -1888.98,541.98 -1532,185 -1397,185 -1366.32,215.68 -1347.13,215.68 -1333,201.56 -1333,161 -1276,104 -1248,104 -1214,70 -1214,-193 -1110,-297 -879,-297 -844,-262 -616,-262 -565,-211 -534,-211 -514.27,-191.27 v1(-284.22,-191.27)
ADF4001_DATA: R132.1 U1.E9 | length 2158.6
  Top w6: R132.1@-1825.35,614.66 -1824.12,613.43 v1(-1824.12,585.33) ; v1(-189.22,-63.78) U1.E9@-173.47,-48.03
  Layer 3 w6: v1(-1824.12,585.33) -1824.12,538.12 -1555.3,269.3 -1276.3,269.3 -1246,239 -1246,172.81 -1172,98.81 -1172,11 -1110,-51 -890.86,-51 -865.86,-76 -631.21,-76 -564.21,-9 -448,-9 -422,-35 -335.9,-35 -318.18,-17.28 -210.72,-17.28 -205,-23 -205,-48 v1(-189.22,-63.78)
ADF4001_LE: R133.1 U1.E8 | length 2173.8
  Top w6: R133.1@-1793.35,614.66 -1793,614.32 v1(-1793,584) ; v1(-189.22,-95.28) U1.E8@-173.47,-79.53
  Layer 1 w6: v1(-1793,584) -1793,526 -1425,158 -1270,158 -1185,73 -1185,-16 -1119,-82 -687,-82 -673,-96 -673,-173 -655,-191 -622,-191 -609,-178 -564,-178 -534,-148 -492,-148 -469,-125 -446,-125 -430,-141 -368.85,-141 -323.85,-96 -256,-96 -241.72,-110.28 -204.22,-110.28 v1(-189.22,-95.28)
ADF4001_PLL_REF: C278.1 R142.2 | length 70.1
  Top w6: C278.1@-1854.35,952.03 -1852,954.38 -1852,969.54 -1849.54,972 -1823.81,972 -1821.35,974.46 R142.2@-1821.35,993.35
BOOT: R23.1 R24.1 S3.2 | length 1817.9
  Bottom w8: S3.2@-1978.7,-1154.9 -1978.7,-1194.8 -1962.7,-1210.8 -1866.7,-1210.8 -1844.1,-1233.4 -1623.4,-1233.4 -1584.3,-1194.3 -1584.3,-1007.4 -1457.58,-880.68 -870.68,-880.68 -829.42,-839.42 -829.42,-631.1 -845.52,-615 R23.1@-876,-615 -875.68,-615.32 -875.68,-632.16 -882.52,-639 -904.52,-639 -910.52,-645 -910.52,-659.15 R24.1@-915.37,-664
CH32H417_RX: U1.H18 U24.55 | length 1508.3
  Top w4.2: U24.55@-574.2,396.1 -573.65,395.55 -528.55,395.55 v1(-528,395) ; v1(-94.73,251.07) v1(-94.73,251.07) U1.H18@-78.98,235.43 U1.H18@-78.98,235.43
  Layer 1 w5: v1(-528,395) -456,395 -335,516 -296.22,516 -293.72,516 -290.79,518.93 -290.79,530.5 -289.29,532 -282.29,532 -280.79,530.5 -280.79,517.5 -279.29,516 -272.29,516 -270.79,517.5 -270.79,530.5 -269.29,532 -262.29,532 -260.79,530.5 -260.79,517.5 -259.29,516 -252.29,516 -250.79,517.5 -250.79,530.5 -249.29,532 -242.29,532 -240.79,530.5 -240.79,517.5 -239.29,516 -232.29,516 -230.79,517.5 -230.79,530.5 -229.29,532 -222.29,532 -220.79,530.5 -220.79,517.5 -219.29,516 -212.29,516 -210.79,517.5 -210.79,530.5 -209.29,532 -202.29,532 -200.79,530.5 -200.79,517.5 -199.29,516 -192.29,516 -190.79,517.5 -190.79,530.05 -189.29,531.55 -182.29,531.55 -180.79,530.05 -180.79,518.93 -177.87,516 -172,516 -164,516 -157.5,509.5 -155.73,507.73 -151.59,507.73 -134.59,524.74 -132.46,524.74 -127.51,519.79 -127.51,517.67 -151.17,494.01 -151.17,491.89 -146.22,486.94 -144.09,486.94 -120.44,510.59 -118.32,510.59 -113.37,505.64 -113.37,503.52 -137.02,479.87 -137.02,477.75 -132.07,472.8 -129.95,472.8 -106.3,496.45 -104.18,496.45 -99.23,491.5 -99.23,489.38 -122.88,465.73 -122.88,463.61 -117.93,458.66 -112.16,458.66 -109.23,455.73 -109.23,449.81 -109.23,446 -109.23,443.5 -106.3,440.57 -90.73,440.57 -89.23,439.07 -89.23,432.07 -90.73,430.57 -115.73,430.57 -117.23,429.07 -117.23,422.07 -115.73,420.57 -90.73,420.57 -89.23,419.07 -89.23,412.07 -90.73,410.57 -115.73,410.57 -117.23,409.07 -117.23,402.07 -115.73,400.57 -90.73,400.57 -89.23,399.07 -89.23,392.07 -90.73,390.57 -115.73,390.57 -117.23,389.07 -117.23,382.07 -115.73,380.57 -90.73,380.57 -89.23,379.07 -89.23,372.07 -90.73,370.57 -115.73,370.57 -117.23,369.07 -117.23,362.07 -115.73,360.57 -90.73,360.57 -89.23,359.07 -89.23,352.07 -90.73,350.57 -115.73,350.57 -117.23,349.07 -117.23,342.07 -115.73,340.57 -90.73,340.57 -89.23,339.07 -89.23,332.07 -90.73,330.57 -115.73,330.57 -117.23,329.07 -117.23,322.07 -115.73,320.57 -90.73,320.57 -89.23,319.07 -89.23,312.07 -90.73,310.57 -115.73,310.57 -117.23,309.07 -117.23,302.07 -115.73,300.57 -112.16,300.57 -109.23,297.64 -109.23,291 -109.23,265.68 -94.73,251.18 v1(-94.73,251.07)
CH32H417_RX2: TP1.1 U24.80 | length 538.4
  Top w6: TP1.1@-1220,755 -1218.5,756.5 -1099.5,756.5 v1(-1098,758) ; v1(-811,641) -810.7,640.7 -810.7,601.1 U24.80@-810.4,600.8
  Layer 3 w6: v1(-1098,758) -861,758 -811,708 v1(-811,641)
CH32H417_TX: U1.G19 U24.54 | length 1508.1
  Top w4.2: U24.54@-574.2,380.4 -574,380.2 -544.2,380.2 v1(-544,380) ; v1(-126.23,282.68) U1.G19@-110.48,266.93
  Layer 1 w5: v1(-544,380) -543.5,380.5 -445.5,380.5 -433,393 -431.23,394.77 -431.23,398.91 -434.24,401.91 -434.24,404.04 -429.29,408.99 -427.17,408.99 -422.99,404.81 -420.87,404.81 -415.92,409.76 -415.92,411.88 -420.09,416.06 -420.09,418.18 -415.14,423.13 -413.02,423.13 -408.97,419.07 -406.85,419.07 -401.9,424.02 -401.9,426.14 -405.95,430.2 -405.95,432.32 -401,437.27 -398.88,437.27 -387.23,425.62 -385.11,425.62 -380.16,430.57 -380.16,432.69 -391.81,444.34 -391.81,446.46 -386.86,451.41 -384.74,451.41 -367.7,434.38 -365.58,434.38 -360.63,439.32 -360.63,441.45 -377.67,458.48 -377.67,460.6 -372.72,465.55 -370.6,465.55 -361.48,456.44 -359.36,456.44 -354.41,461.39 -354.41,463.51 -363.53,472.62 -363.53,474.75 -358.58,479.7 -356.45,479.7 -340.39,463.63 -338.27,463.63 -333.32,468.58 -333.32,470.7 -349.38,486.77 -349.38,488.89 -344.43,493.84 -342.31,493.84 -334.47,486 -330.86,486 -321,486 -318.5,486 -315.57,488.93 -315.57,505.5 -314.07,507 -307.07,507 -305.57,505.5 -305.57,464.5 -304.07,463 -297.07,463 -295.57,464.5 -295.57,505.5 -294.07,507 -287.07,507 -285.57,505.5 -285.57,464.5 -284.07,463 -277.07,463 -275.57,464.5 -275.57,505.5 -274.07,507 -267.07,507 -265.57,505.5 -265.57,464.5 -264.07,463 -257.07,463 -255.57,464.5 -255.57,505.5 -254.07,507 -247.07,507 -245.57,505.5 -245.57,464.5 -244.07,463 -237.07,463 -235.57,464.5 -235.57,505.5 -234.07,507 -227.07,507 -225.57,505.5 -225.57,464.5 -224.07,463 -217.07,463 -215.57,464.5 -215.57,505.5 -214.07,507 -207.07,507 -205.57,505.5 -205.57,464.5 -204.07,463 -197.07,463 -195.57,464.5 -195.57,505.5 -194.07,507 -187.07,507 -185.57,505.5 -185.57,464.5 -184.07,463 -177.07,463 -175.57,464.5 -175.57,492.59 -174.07,494.09 -167.07,494.09 -165.57,492.59 -165.57,488.93 -162.64,486 -158,486 -144,472 -126.23,454.23 v1(-126.23,282.68)
CH32H417_TX2: TP2.1 U24.81 | length 584.7
  Top w6: TP2.1@-1331,755 -1262.91,686.91 -1251.91,686.91 v1(-1250,685) ; v1(-826.62,628.51) -826.41,628.3 -826.41,601.01 U24.81@-826.2,600.8
  Layer 3 w6: v1(-1250,685) -883.11,685 v1(-826.62,628.51)
CH32H417_XI: C161.1 U24.12 Y1.3 | length 193.7
  Top w8: Y1.3@-1096.65,417.59 -1072.9,393.84 -999.16,393.84 -996.9,396.1 U24.12@-967.9,396.1 ; Y1.3@-1094.68,419.56 C161.1@-1094.68,471
  Top w10: Y1.3@-1096.65,417.59 Y1.3@-1094.68,419.56
CH32H417_XO: C162.1 U24.13 Y1.1 | length 151.5
  Top w8: C162.1@-1055.32,307 -1055.32,362.47 Y1.1@-1053.35,364.44 -1053.35,366.41 -1041.6,378.16 -1039.63,378.16 -1037.39,380.4 U24.13@-967.9,380.4
CLK_FB_FPGA: R141.1 U1.H17 | length 2281.2
  Top w4.2: v1(-94.98,219.68) v1@-94.86,219.68 ; U1.H17@-79.11,203.94 U1.H17@-78.98,203.94
  Top w6: R141.1@-1742.66,1065.35 -1741.32,1064 v1(-1704,1064) ; v1@-94.86,219.68 U1.H17@-79.11,203.94
  Layer 3 w6: v1(-1704,1064) -1626.9,1064 -1556.6,993.7 -1556.6,844.6 v1(-1396,684)
  Bottom w6: v1(-1396,684) -1308,596 -175.38,596 -111.23,531.85 -111.23,235.93 v1(-94.98,219.68)
DAC_OUT: C277.2 R101.2 R109.1 R123.1 U24.22 Y6.1 | length 1807
  Top w4.2: Y6.1@-2080.35,904.55 Y6.1@-2078.13,902.33
  Top w6: Y6.1@-2078.13,902.33 v1(-2043.17,902.33) ; R123.1@-1739.66,953.35 -1738.66,952.35 C277.2@-1738.66,918.35 ; v1(-1737.57,893.79) -1738.66,894.89 C277.2@-1738.66,918.35 ; R109.1@-1666.35,871.03 -1666.35,902.35 -1676,912 -1697.68,912 R101.2@-1701.35,915.66 -1735.98,915.66 C277.2@-1738.66,918.35 ; v1(-1017,238.84) -1016.88,238.72 -968.02,238.72 U24.22@-967.9,238.6
  Layer 2 w6: v1(-2043.17,902.33) -2005.84,865 -1766.36,865 ; v1(-1737.57,893.79) -1766.36,865 ; v1(-1017,238.84) -1028.8,250.64 -1028.8,579.5 -1040.9,591.6 -1311.1,591.6 -1385.3,665.8 -1405.3,665.8 -1421.5,682 -1421.5,707.1 -1569.28,854.88 -1738.29,854.88 -1748.41,865 -1766.36,865
DDR3_A0: R31.2 U1.N2 U2.N3 U3.N3 | length 2389.3
  Top w4.2: U2.N3@-363.98,-952.95 -334,-982.93 -334,-998.8 v1(-316.85,-1015.94) ; v1(0,-1015.48) 40.48,-1015.48 72.5,-1047.5 72.5,-1109.5 80,-1117 109,-1117 124,-1102 124,-545 131.99,-537.01 135.47,-537.01 146.9,-548.44 148.85,-548.44 153.4,-543.88 153.4,-541.93 140.51,-529.04 140.51,-527.09 145.06,-522.53 147.02,-522.53 159.91,-535.43 161.86,-535.43 166.41,-530.87 166.41,-528.92 153.52,-516.03 153.52,-514.08 158.07,-509.52 160.03,-509.52 172.92,-522.41 174.87,-522.41 179.42,-517.86 179.42,-515.91 166.53,-503.02 166.53,-501.07 171.09,-496.51 173.04,-496.51 175.94,-499.41 177.89,-499.41 182.44,-494.86 182.44,-492.91 181.01,-491.47 181.01,-487.99 195.38,-473.62 197,-472 197,-460.7 199.46,-458.24 215.62,-458.24 217,-456.86 217,-450.42 215.62,-449.04 198.38,-449.04 197,-447.66 197,-441.22 198.38,-439.84 215.62,-439.84 217,-438.46 217,-432.02 215.62,-430.64 185.58,-430.64 184.2,-429.26 184.2,-422.82 185.58,-421.44 194.54,-421.44 197,-418.98 197,-409 196,-408 192.03,-404.03 188.55,-404.03 185.06,-407.52 183.11,-407.52 178.56,-402.96 178.56,-401.01 196.95,-382.62 196.95,-380.67 192.4,-376.11 190.45,-376.11 178.25,-388.3 176.3,-388.3 171.75,-383.75 171.75,-381.8 183.94,-369.61 183.94,-367.66 179.39,-363.1 177.43,-363.1 165.24,-375.29 163.29,-375.29 158.74,-370.74 158.74,-368.79 170.93,-356.6 170.93,-354.64 166.38,-350.09 164.42,-350.09 152.23,-362.28 150.28,-362.28 145.73,-357.73 145.73,-355.78 151.07,-350.43 151.07,-348.48 146.52,-343.93 144.57,-343.93 139.22,-349.27 137.27,-349.27 132.72,-344.72 132.72,-342.76 136.21,-339.27 136.21,-337.32 131.66,-332.76 129.71,-332.76 126.21,-336.26 124.26,-336.26 119.71,-331.71 119.71,-329.75 123.2,-326.26 123.2,-324.3 118.65,-319.75 116.7,-319.75 113.96,-322.49 110.49,-322.49 109,-321 93.45,-305.45 93.45,-283.46 U1.N2@78.5,-268.5 ; U3.N3@237.51,-952.95 267.5,-982.93 267.5,-998.8 v1(284.64,-1015.94)
  Layer 1 w5: v1(-316.85,-1015.94) -316.39,-1015.48 -242.52,-1015.48 -213,-1045 -92,-1045 -62.48,-1015.48 v1(0,-1015.48) 0.23,-1015.71 89.71,-1015.71 120.19,-1046.19 132,-1046.19 170.19,-1046.19 197.87,-1046.19 202.41,-1050.74 204.54,-1050.74 209.49,-1045.79 209.49,-1043.67 204.24,-1038.42 204.24,-1036.3 209.19,-1031.35 211.31,-1031.35 216.56,-1036.59 218.68,-1036.59 223.63,-1031.64 223.63,-1029.52 223.12,-1029.02 223.12,-1024.88 229,-1019 232.29,-1015.71 234.79,-1015.71 237.72,-1012.78 237.72,-1011.25 239.22,-1009.75 246.22,-1009.75 247.72,-1011.25 247.72,-1012.78 250.65,-1015.71 256.36,-1015.71 284.41,-1015.71 v1(284.64,-1015.94)
  Bottom w4.2: R31.2@-32,-1014.83 -31.35,-1015.48 v1(0,-1015.48)
DDR3_A1: R32.2 U1.K2 U2.P7 U3.P7 | length 2411.2
  Top w4.2: v1(-283.85,-1063.42) -282.72,-1062.29 -282.72,-1052.72 -252.8,-1022.8 -252.8,-999.25 U2.P7@-238,-984.45 ; U1.K2@-15.99,-268.5 -1.03,-283.46 -1.03,-339.03 -8,-346 -22.19,-360.19 -22.19,-363.67 -20.2,-365.65 -20.2,-367.61 -24.76,-372.16 -26.71,-372.16 -32.16,-366.71 -34.11,-366.71 -38.67,-371.26 -38.67,-373.21 -33.21,-378.67 -33.21,-380.62 -37.77,-385.17 -39.72,-385.17 -45.17,-379.72 -47.12,-379.72 -51.68,-384.27 -51.68,-386.22 -46.22,-391.68 -46.22,-393.63 -50.78,-398.18 -52.73,-398.18 -58.18,-392.73 -60.13,-392.73 -64.69,-397.28 -64.69,-399.23 -59.24,-404.69 -59.24,-406.64 -63.79,-411.19 -65.74,-411.19 -71.19,-405.74 -73.14,-405.74 -77.7,-410.29 -77.7,-412.25 -72.25,-417.7 -72.25,-419.65 -76.8,-424.2 -78.75,-424.2 -84.2,-418.75 -86.15,-418.75 -90.71,-423.3 -90.71,-425.26 -85.26,-430.71 -85.26,-432.66 -89.81,-437.21 -91.76,-437.21 -93.75,-435.23 -97.23,-435.23 -100,-438 -100,-497 -100,-505 -100,-541.13 -97.54,-543.59 -96.16,-544.97 -96.16,-551.41 -97.54,-552.79 -102.82,-552.79 -104.2,-554.17 -104.2,-560.61 -102.82,-561.99 -96.58,-561.99 -95.2,-563.37 -95.2,-569.81 -96.58,-571.19 -103.42,-571.19 -104.8,-572.57 -104.8,-579.01 -103.42,-580.39 -96.58,-580.39 -95.2,-581.77 -95.2,-588.21 -96.58,-589.59 -103.42,-589.59 -104.8,-590.97 -104.8,-597.41 -103.42,-598.79 -96.58,-598.79 -95.2,-600.17 -95.2,-606.61 -96.58,-607.99 -103.42,-607.99 -104.8,-609.37 -104.8,-615.81 -103.42,-617.19 -96.58,-617.19 -95.2,-618.57 -95.2,-625.01 -96.58,-626.39 -103.42,-626.39 -104.8,-627.77 -104.8,-634.21 -103.42,-635.59 -96.58,-635.59 -95.2,-636.97 -95.2,-643.41 -96.58,-644.79 -103.42,-644.79 -104.8,-646.17 -104.8,-652.61 -103.42,-653.99 -96.58,-653.99 -95.2,-655.37 -95.2,-661.81 -96.58,-663.19 -103.42,-663.19 -104.8,-664.57 -104.8,-671.01 -103.42,-672.39 -96.58,-672.39 -95.2,-673.77 -95.2,-680.21 -96.58,-681.59 -103.42,-681.59 -104.8,-682.97 -104.8,-689.41 -103.42,-690.79 -96.58,-690.79 -95.2,-692.17 -95.2,-698.61 -96.58,-699.99 -103.42,-699.99 -104.8,-701.37 -104.8,-707.81 -103.42,-709.19 -96.58,-709.19 -95.2,-710.57 -95.2,-717.01 -96.58,-718.39 -103.42,-718.39 -104.8,-719.77 -104.8,-726.21 -103.42,-727.59 -96.58,-727.59 -95.2,-728.97 -95.2,-735.41 -96.58,-736.79 -103.42,-736.79 -104.8,-738.17 -104.8,-744.61 -103.42,-745.99 -96.58,-745.99 -95.2,-747.37 -95.2,-753.81 -96.58,-755.19 -103.42,-755.19 -104.8,-756.57 -104.8,-763.01 -103.42,-764.39 -96.58,-764.39 -95.2,-765.77 -95.2,-772.21 -96.58,-773.59 -103.42,-773.59 -104.8,-774.97 -104.8,-781.41 -103.42,-782.79 -96.58,-782.79 -95.2,-784.17 -95.2,-790.61 -96.58,-791.99 -103.42,-791.99 -104.8,-793.37 -104.8,-799.81 -103.42,-801.19 -102.46,-801.19 -100,-803.65 -100,-805.75 -100,-1120 -32.94,-1187.06 7.94,-1187.06 16.5,-1178.5 16.5,-1078.5 v1(33,-1062) ; v1(317.64,-1063.42) 318.77,-1062.29 318.77,-1052.72 348.7,-1022.8 348.7,-999.25 U3.P7@363.5,-984.45
  Layer 1 w5: v1(-283.85,-1063.42) -249.58,-1063.42 -211,-1102 -89,-1102 -49,-1062 v1(33,-1062) 76,-1062 120,-1106 187.5,-1106 201,-1106 206.02,-1100.98 210.16,-1100.98 212.29,-1100.99 217.24,-1096.04 217.24,-1093.92 212.58,-1089.26 212.58,-1087.14 217.53,-1082.19 219.66,-1082.19 224.31,-1086.84 226.43,-1086.84 231.38,-1081.89 231.38,-1079.77 226.73,-1075.12 226.73,-1073 231.68,-1068.05 233.8,-1068.05 234.3,-1068.56 238.44,-1068.56 243.58,-1063.42 265.42,-1063.42 v1(317.64,-1063.42)
  Bottom w4.2: v1(33,-1062) 63.09,-1062 R32.2@65,-1060.09
DDR3_A2: R33.2 U1.M3 U2.P3 U3.P3 | length 2417.4
  Top w4.2: U2.P3@-363.98,-984.45 -363.98,-996.19 -346,-1014.18 -346,-1030.39 -335,-1041.39 -335,-1060.79 v1(-316.85,-1078.93) ; U1.M3@47,-237.01 47,-237.13 62.5,-252.63 v1(62.5,-252.76) ; U3.P3@237.51,-984.45 237.51,-996.19 255.5,-1014.18 255.5,-1030.39 266.5,-1041.39 266.5,-1060.79 v1(284.64,-1078.93)
  Layer 1 w5: v1(-316.85,-1078.93) -253.07,-1078.93 -217,-1115 -83,-1115 -46.47,-1078.47 v1(0,-1078.47) 72.47,-1078.47 79,-1085 80.77,-1086.77 84.91,-1086.77 85.41,-1086.26 87.54,-1086.26 92.49,-1091.21 92.49,-1093.33 87.33,-1098.49 87.33,-1100.61 92.28,-1105.56 94.41,-1105.56 99.56,-1100.41 101.68,-1100.41 106.63,-1105.36 106.63,-1107.48 102.01,-1112.09 102.01,-1114.21 106.96,-1119.16 109.09,-1119.16 109.25,-1119 134,-1119 207,-1119 247.07,-1078.93 v1(284.64,-1078.93) ; v1(62.5,-252.76) 62.5,-397.5 v1(104,-439)
  Layer 2 w5: v1(0,-1078.47) 52.53,-1078.47 62,-1069 65.31,-1065.69 65.31,-1061.54 61,-1057.23 61,-1050.63 63.2,-1048.43 91.8,-1048.43 94,-1046.23 94,-1039.63 91.8,-1037.43 68.04,-1037.43 65.84,-1035.23 65.84,-1028.63 68.04,-1026.43 91.8,-1026.43 94,-1024.23 94,-1017.63 91.8,-1015.43 75.2,-1015.43 73,-1013.23 73,-1006.63 75.2,-1004.43 91.8,-1004.43 94,-1002.23 94,-995.63 91.8,-993.43 75.2,-993.43 73,-991.23 73,-984.63 75.2,-982.43 91.8,-982.43 94,-980.23 94,-973.63 91.8,-971.43 75.2,-971.43 73,-969.23 73,-962.63 75.2,-960.43 91.8,-960.43 94,-958.23 94,-951.63 91.8,-949.43 75.2,-949.43 73,-947.23 73,-940.63 75.2,-938.43 91.8,-938.43 94,-936.23 94,-929.63 91.8,-927.43 75.2,-927.43 73,-925.23 73,-918.63 75.2,-916.43 91.8,-916.43 94,-914.23 94,-907.63 91.8,-905.43 75.2,-905.43 73,-903.23 73,-896.63 75.2,-894.43 91.8,-894.43 94,-892.23 94,-885.63 91.8,-883.43 75.2,-883.43 73,-881.23 73,-874.63 75.2,-872.43 91.8,-872.43 94,-870.23 94,-863.63 91.8,-861.43 75.2,-861.43 73,-859.23 73,-852.63 75.2,-850.43 91.8,-850.43 94,-848.23 94,-841.63 91.8,-839.43 75.2,-839.43 73,-837.23 73,-830.63 75.2,-828.43 91.8,-828.43 94,-826.23 94,-819.63 91.8,-817.43 75.2,-817.43 73,-815.23 73,-808.63 75.2,-806.43 91.8,-806.43 94,-804.23 94,-797.63 91.8,-795.43 75.2,-795.43 73,-793.23 73,-786.63 75.2,-784.43 91.8,-784.43 94,-782.23 94,-775.63 91.8,-773.43 77.02,-773.43 74.82,-771.23 74.82,-764.63 77.02,-762.43 83.07,-762.43 86,-759.5 86,-537 86,-527 126,-487 126,-460 105,-439 v1(104,-439)
  Bottom w4.2: R33.2@-32,-1077.17 -30.7,-1078.47 v1(0,-1078.47)
DDR3_A3: R34.2 U1.K3 U2.N2 U3.N2 | length 2453.7
  Top w4.2: U2.N2@-395.48,-952.95 -381.52,-966.91 -361.77,-966.91 -346.2,-982.48 -346.2,-998.69 -336,-1008.89 -336,-1028.29 v1(-316.85,-1047.44) ; U1.K3@-15.99,-237.01 -32,-253.02 -32,-335 -125,-428 -125,-1169 -40,-1254 29,-1254 62,-1221 62,-1058.08 50.82,-1046.9 21.68,-1046.9 21.61,-1046.98 v1(0,-1046.98) ; U3.N2@206.02,-952.95 219.98,-966.91 239.73,-966.91 255.3,-982.48 255.3,-998.69 265.5,-1008.89 265.5,-1028.29 v1(284.64,-1047.44)
  Layer 1 w5: v1(-316.85,-1047.44) -246.56,-1047.44 -206,-1088 -95,-1088 -53.98,-1046.98 v1(0,-1046.98) 80.98,-1046.98 127,-1093 129.5,-1093 132.43,-1090.07 132.43,-1089.5 133.93,-1088 140.93,-1088 142.43,-1089.5 142.43,-1095.5 143.93,-1097 150.93,-1097 152.43,-1095.5 152.43,-1089.5 153.93,-1088 160.93,-1088 162.43,-1089.5 162.43,-1093.29 163.93,-1094.79 170.93,-1094.79 172.43,-1093.29 172.43,-1090.07 173.93,-1088.57 180.93,-1088.57 182.43,-1090.07 185.36,-1093 194,-1093 227.03,-1059.97 239.56,-1047.44 v1(284.64,-1047.44)
  Bottom w4.2: R34.2@-32,-1046 -31.02,-1046.98 v1(0,-1046.98)